# Altium PCB 1H-WSL007-2-1.PcbDoc (part 3 of 4)
Units mil, origin at the board's own origin, x right, y up, seen from the top; angles counter-clockwise.
Board outline 6030 x 4220 mil, 4 copper layers (Top Layer, Mid-Layer 1, Mid-Layer 2, Bottom Layer), stack 90.192 mil thick; 369 components, 15 nets, 801 pads, 1963 vias.
Unrouted connection lines stored in the file: 45.
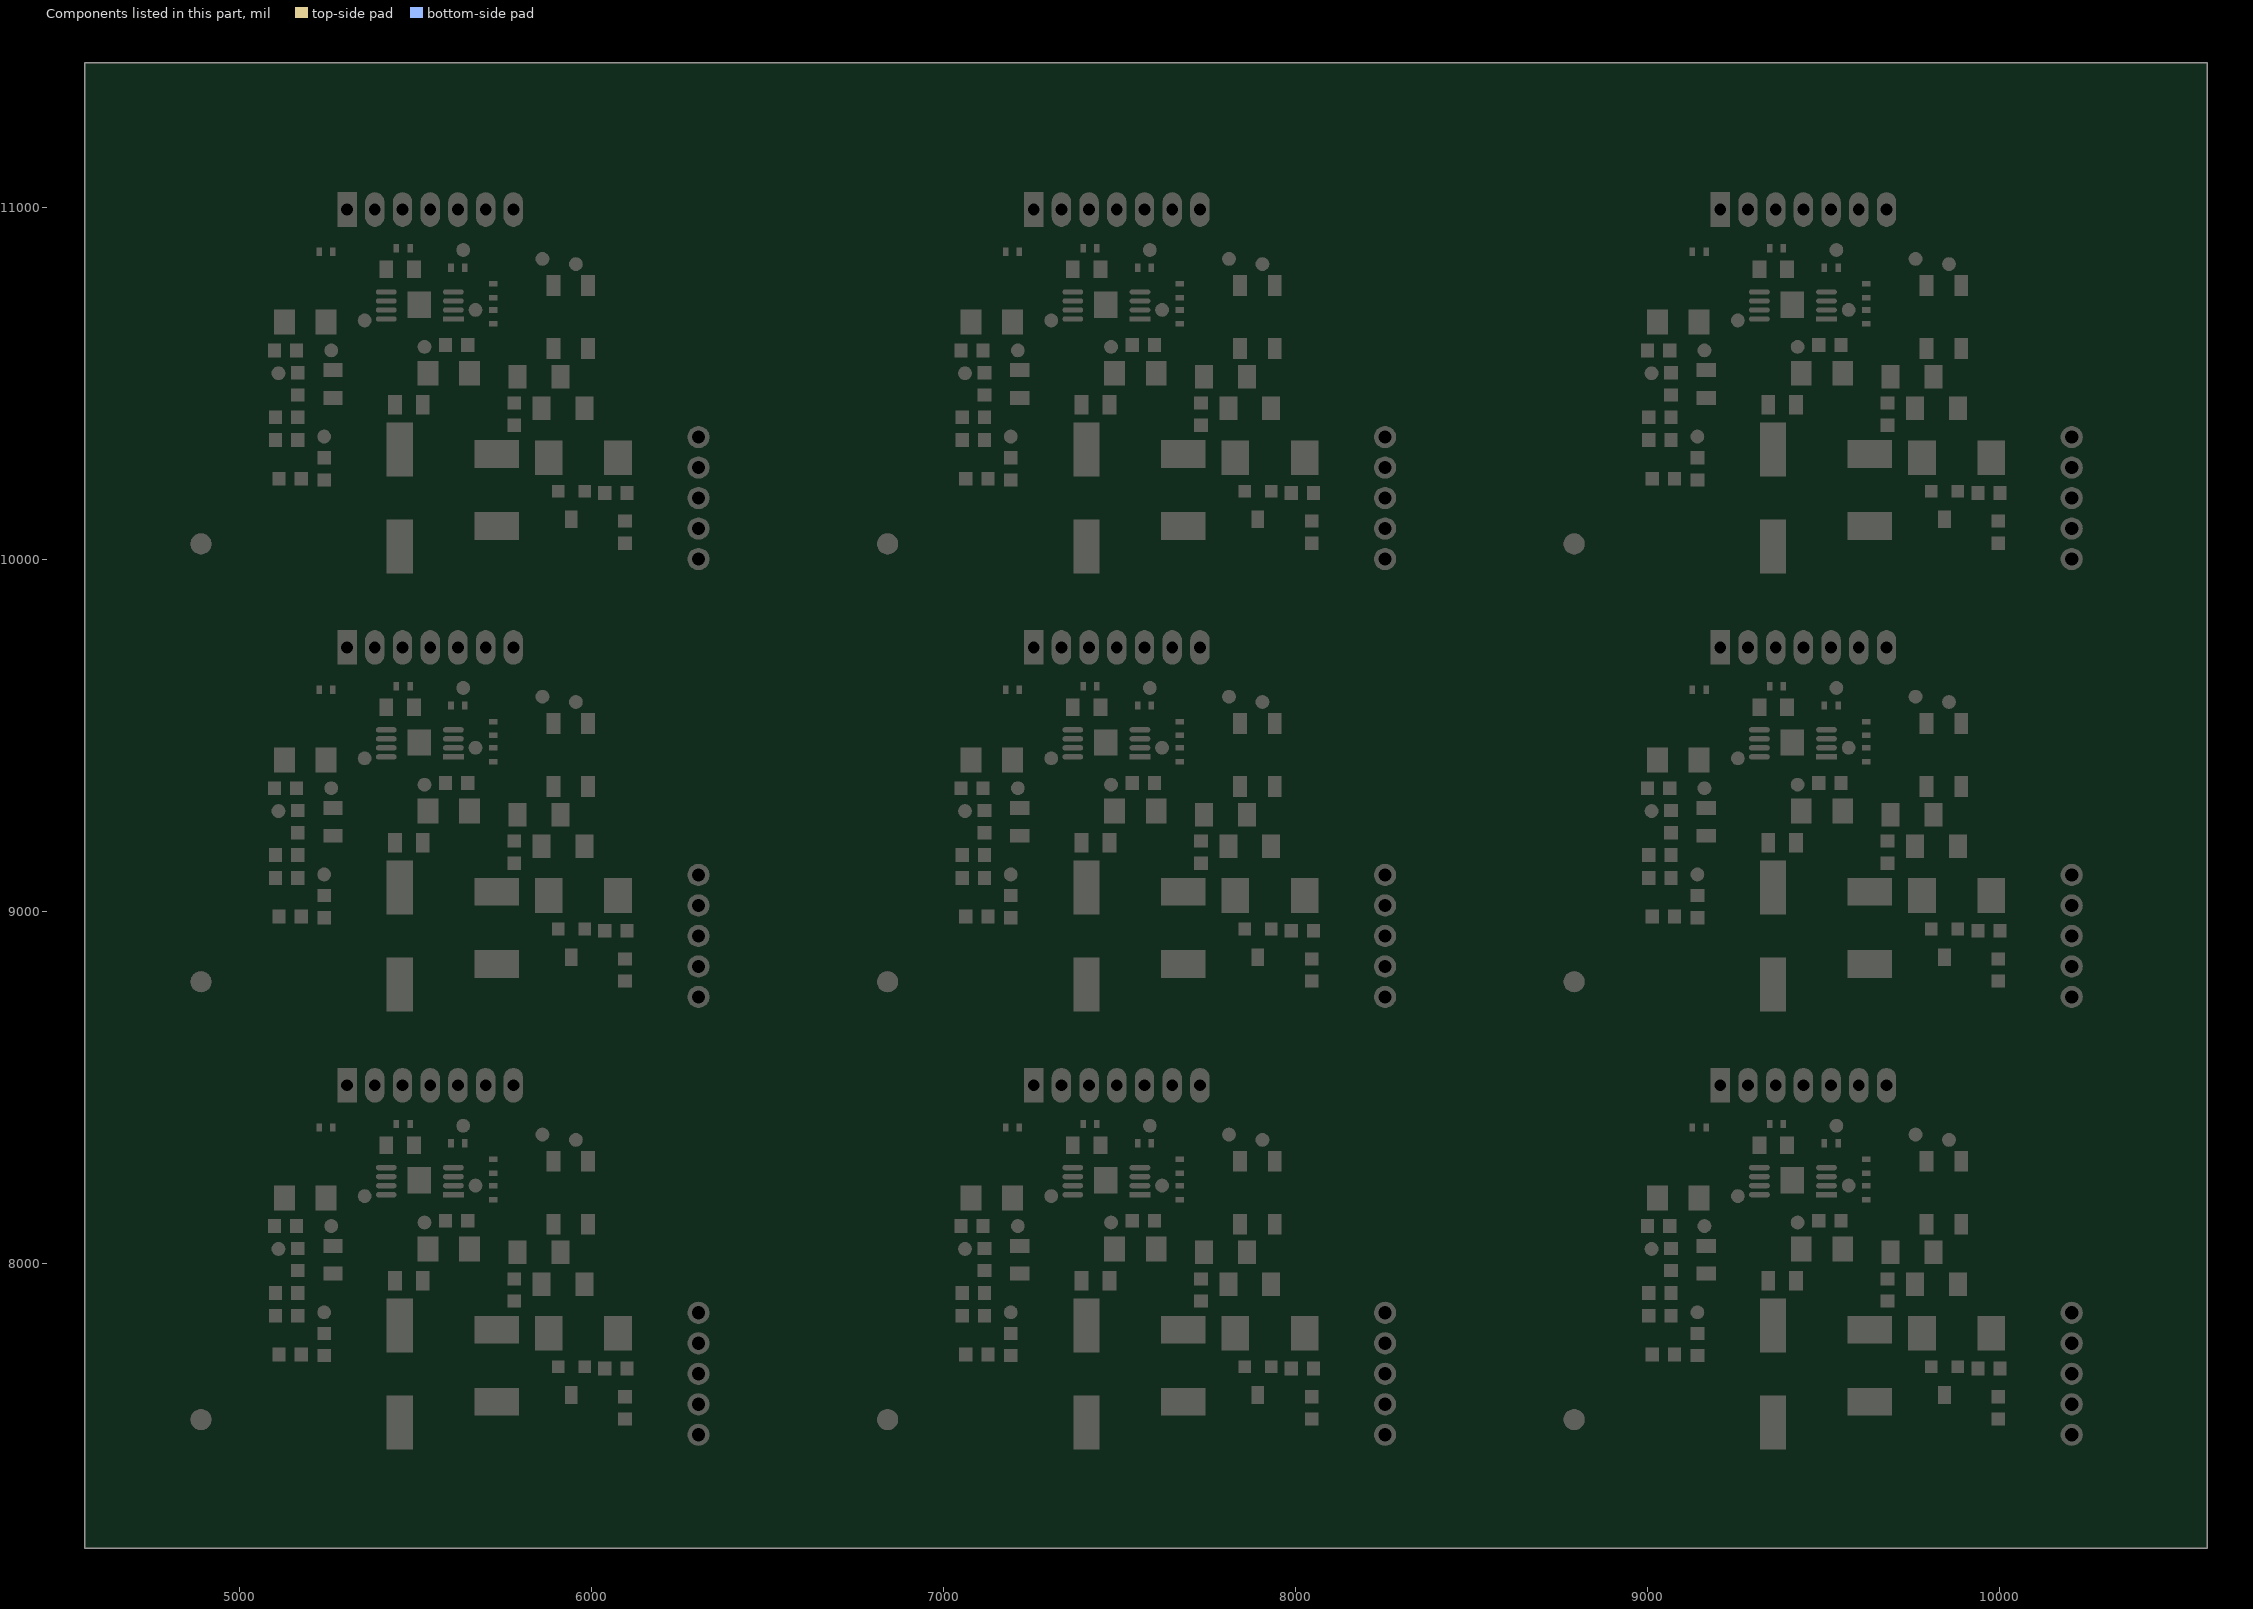
[diagram p5: the components of this part, seen from the top]

## Via types
v1: diameter 24, hole 12, Top Layer to Bottom Layer, tented both sides, 1918 vias
v2: diameter 16, hole 8, Top Layer to Bottom Layer, tented both sides, 45 vias

## Nets (pads, with @x,y where several pads share a name; then routed paths per layer and width w, separated by ;. In a path a pad name is that pad's centre, name@x,y a point inside that pad or via, vN(x,y) a via of type N, cw(c..) or ccw(c..) an arc to the next point about the centre after c; other vN are vias at no path point) (continued)
copper on no net: (continued)
  other v1: 5020,7440 5235,7440 5624.41,7439.74 5845,7440 6500,7440 6970.79,7440 7185.79,7440 7575.2,7439.74 7795.79,7440 8450.79,7440 8921.57,7440 9136.57,7440 9525.98,7439.74 9746.57,7440 10401.57,7440 5450,7445 6050,7445 6220,7445 6365,7445 6565,7445 7400.79,7445 8000.79,7445 8170.79,7445 8315.79,7445 8515.79,7445 9351.57,7445 9951.57,7445 10121.57,7445 10266.57,7445 10466.57,7445 4775,7470 6725.79,7470 8676.57,7470 6430,7490 8380.79,7490 10331.57,7490 5725,7495 7675.79,7495 9626.57,7495 5135,7505 5845,7505 7085.79,7505 7795.79,7505 9036.57,7505 9746.57,7505 6100,7510 8050.79,7510 10001.57,7510 5040,7520 6210,7520 6990.79,7520 8160.79,7520 8941.57,7520 10111.57,7520 5530,7530 5665,7530 7480.79,7530 7615.79,7530 9431.57,7530 9566.57,7530 5785,7535 7735.79,7535 9686.57,7535 5390,7540 6030,7540 7340.79,7540 7980.79,7540 9291.57,7540 9931.57,7540 5240,7555 6440,7555 7190.79,7555 8390.79,7555 9141.57,7555 10341.57,7555 5190,7560 6185,7560 7140.79,7560 8135.79,7560 9091.57,7560 10086.57,7560 6500,7570 8450.79,7570 10401.57,7570 6380,7575 8330.79,7575 10281.57,7575 5135,7585 5850,7585 7085.79,7585 7800.79,7585 9036.57,7585 9751.57,7585 5560,7590 6570,7590 7510.79,7590 8520.79,7590 9461.57,7590 10471.57,7590 5640,7595 6225,7595 7590.79,7595 8175.79,7595 9541.57,7595 10126.57,7595 5295,7600 7245.79,7600 9196.57,7600 6150,7605 8100.79,7605 10051.57,7605 5365,7625 7315.79,7625 9266.57,7625 5180,7630 6020,7630 7130.79,7630 7970.79,7630 9081.57,7630 9921.57,7630 5455,7650 7405.79,7650 9356.57,7650 5900,7655 7850.79,7655 9801.57,7655 6375,7665 8325.79,7665 10276.57,7665 4750,7670 5675,7670 5795,7670 6700.79,7670 7625.79,7670 7745.79,7670 8651.57,7670 9576.57,7670 9696.57,7670 5575,7680 7525.79,7680 9476.57,7680 5105,7685 5245,7685 7055.79,7685 7195.79,7685 9006.57,7685 9146.57,7685 6230,7695 8180.79,7695 10131.57,7695 6155,7700 8105.79,7700 10056.57,7700 5740,7710 7690.79,7710 9641.57,7710 5450,7715 7400.79,7715 9351.57,7715 5860,7720 7810.79,7720 9761.57,7720 6255,7730 8205.79,7730 10156.57,7730 6565,7735 8515.79,7735 10466.57,7735 5790,7745 7740.79,7745 9691.57,7745 6380,7750 8330.79,7750 10281.57,7750 6000,7755 7950.79,7755 9901.57,7755 5300,7760 5380,7760 5525,7760 5630,7760 7250.79,7760 7330.79,7760 7475.79,7760 7580.79,7760 9201.57,7760 9281.57,7760 9426.57,7760 9531.57,7760 5095,7795 7045.79,7795 8996.57,7795 5195,7805 6480,7805 7145.79,7805 8430.79,7805 9096.57,7805 10381.57,7805 6260,7820 8210.79,7820 10161.57,7820 6145,7825 8095.79,7825 10046.57,7825 6195,7850 8145.79,7850 10096.57,7850 5525,7855 7475.79,7855 9426.57,7855 5635,7860 6385,7860 7585.79,7860 8335.79,7860 9536.57,7860 10286.57,7860 5295,7865 6565,7865 7245.79,7865 8515.79,7865 9196.57,7865 10466.57,7865 4750,7875 6000,7875 6700.79,7875 7950.79,7875 8651.57,7875 9901.57,7875 5830,7880 5905,7880 6440,7880 7780.79,7880 7855.79,7880 8390.79,7880 9731.57,7880 9806.57,7880 10341.57,7880 5730,7885 6100,7885 7680.79,7885 8050.79,7885 9631.57,7885 10001.57,7885 5520,7895 7470.79,7895 9421.57,7895 5585,7910 6210,7910 7535.79,7910 8160.79,7910 9486.57,7910 10111.57,7910 5285,7915 5665,7915 6155,7915 7235.79,7915 7615.79,7915 8105.79,7915 9186.57,7915 9566.57,7915 10056.57,7915 5210,7930 5390,7930 7160.79,7930 7340.79,7930 9111.57,7930 9291.57,7930 6040,7935 7990.79,7935 9941.57,7935 6100,7945 8050.79,7945 10001.57,7945 5910,7960 7860.79,7960 9811.57,7960 5570,7975 5665,7975 7520.79,7975 7615.79,7975 9471.57,7975 9566.57,7975 6560,7985 8510.79,7985 10461.57,7985 5115,7990 6235,7990 6375,7990 6495,7990 7065.79,7990 8185.79,7990 8325.79,7990 8445.79,7990 9016.57,7990 10136.57,7990 10276.57,7990 10396.57,7990 5475,8005 6115,8005 7425.79,8005 8065.79,8005 9376.57,8005 10016.57,8005 5325,8015 7275.79,8015 9226.57,8015 5855,8025 7805.79,8025 9756.57,8025 4890,8030 5210,8030 6840.79,8030 7160.79,8030 8791.57,8030 9111.57,8030 4970,8045 6920.79,8045 8871.57,8045 5730,8050 5995,8050 6045,8050 7680.79,8050 7945.79,8050 7995.79,8050 9631.57,8050 9896.57,8050 9946.57,8050 5395,8055 7345.79,8055 9296.57,8055 5055,8060 7005.79,8060 8956.57,8060 5595,8070 7545.79,8070 9496.57,8070 4805,8075 6755.79,8075 8706.57,8075 5450,8080 7400.79,8080 9351.57,8080 5315,8090 7265.79,8090 9216.57,8090 4745,8095 4995,8095 5360,8095 6695.79,8095 6945.79,8095 7310.79,8095 8646.57,8095 8896.57,8095 9261.57,8095 6035,8115 7985.79,8115 9936.57,8115 4930,8120 5210,8120 5700,8120 6105,8120 6880.79,8120 7160.79,8120 7650.79,8120 8055.79,8120 8831.57,8120 9111.57,8120 9601.57,8120 10006.57,8120 4855,8140 6805.79,8140 8756.57,8140 5375,8145 5835,8145 7325.79,8145 7785.79,8145 9276.57,8145 9736.57,8145 5505,8155 7455.79,8155 9406.57,8155 5310,8160 5445,8160 7260.79,8160 7395.79,8160 9211.57,8160 9346.57,8160 5070,8165 5560,8165 7020.79,8165 7510.79,8165 8971.57,8165 9461.57,8165 5670,8170 7620.79,8170 9571.57,8170 5000,8180 6950.79,8180 8901.57,8180 5760,8185 7710.79,8185 9661.57,8185 4930,8205 6035,8205 6880.79,8205 7985.79,8205 8831.57,8205 9936.57,8205 4840,8210 6790.79,8210 8741.57,8210 5070,8220 7020.79,8220 8971.57,8220 5800,8225 7750.79,8225 9701.57,8225 6105,8240 8055.79,8240 10006.57,8240 5205,8245 7155.79,8245 9106.57,8245 5130,8250 5295,8250 7080.79,8250 7245.79,8250 9031.57,8250 9196.57,8250 4885,8260 6835.79,8260 8786.57,8260 4960,8265 5680,8265 6910.79,8265 7630.79,8265 8861.57,8265 9581.57,8265 5840,8270 7790.79,8270 9741.57,8270 5760,8280 7710.79,8280 9661.57,8280 5220,8285 7170.79,8285 9121.57,8285 5030,8289.13 6980.79,8289.13 8931.57,8289.13 4810,8290 6760.79,8290 8711.57,8290 5460,8295 5555,8295 7410.79,8295 7505.79,8295 9361.57,8295 9456.57,8295 4745,8300 5615,8300 6045,8300 6695.79,8300 7565.79,8300 7995.79,8300 8646.57,8300 9516.57,8300 9946.57,8300 5795,8310 7745.79,8310 9696.57,8310 5365,8325 7315.79,8325 9266.57,8325 5155,8335 5735,8335 7105.79,8335 7685.79,8335 9056.57,8335 9636.57,8335 5102.01,8340 5555,8340 7052.8,8340 7505.79,8340 9003.58,8340 9456.57,8340 5810,8350 6005,8350 7760.79,8350 7955.79,8350 9711.57,8350 9906.57,8350 5295,8360 7245.79,8360 9196.57,8360 5680,8370 7630.79,8370 9581.57,8370 6110,8375 8060.79,8375 10011.57,8375 5385,8385 5745,8385 7335.79,8385 7695.79,8385 9286.57,8385 9646.57,8385 5180,8390 5550,8390 6040,8390 7130.79,8390 7500.79,8390 7990.79,8390 9081.57,8390 9451.57,8390 9941.57,8390 5000,8400 5930,8400 6950.79,8400 7880.79,8400 8901.57,8400 9831.57,8400 5595,8425 5675,8425 7545.79,8425 7625.79,8425 9496.57,8425 9576.57,8425 5225,8430 5300,8430 5410,8430 7175.79,8430 7250.79,8430 7360.79,8430 9126.57,8430 9201.57,8430 9311.57,8430 5140,8440 5500,8440 7090.79,8440 7450.79,8440 9041.57,8440 9401.57,8440 5835,8445 5985,8445 7785.79,8445 7935.79,8445 9736.57,8445 9886.57,8445 5085,8455 7035.79,8455 8986.57,8455 4945,8460 6895.79,8460 8846.57,8460 6040,8465 7990.79,8465 9941.57,8465 4835,8495 5020,8495 6785.79,8495 6970.79,8495 8736.57,8495 8921.57,8495 5190,8500 6110,8500 7140.79,8500 8060.79,8500 9091.57,8500 10011.57,8500 4745,8510 6695.79,8510 8646.57,8510 5875,8525 7825.79,8525 9776.57,8525 5105,8530 6045,8530 7055.79,8530 7995.79,8530 9006.57,8530 9946.57,8530 4910,8540 6860.79,8540 8811.57,8540 5245,8550 7195.79,8550 9146.57,8550 5010,8555 6090,8555 6960.79,8555 8040.79,8555 8911.57,8555 9991.57,8555 5165,8560 7115.79,8560 9066.57,8560 5055,8565 7005.79,8565 8956.57,8565 5855,8570 7805.79,8570 9756.57,8570 5440,8590 5725,8590 7390.79,8590 7675.79,8590 9341.57,8590 9626.57,8590 5355,8605 5560,8605 7305.79,8605 7510.79,8605 9256.57,8605 9461.57,8605 4780,8606.26 6730.79,8606.26 8681.57,8606.26 6065,8616.26 8015.79,8616.26 9966.57,8616.26 4990,8631.26 5225,8631.26 5490,8631.26 5680,8631.26 5835,8631.26 5940,8631.26 6940.79,8631.26 7175.79,8631.26 7440.79,8631.26 7630.79,8631.26 7785.79,8631.26 7890.79,8631.26 8891.57,8631.26 9126.57,8631.26 9391.57,8631.26 9581.57,8631.26 9736.57,8631.26 9841.57,8631.26 5020,8684.09 5235,8684.09 5624.41,8683.83 5845,8684.09 6500,8684.09 6970.79,8684.09 7185.79,8684.09 7575.2,8683.83 7795.79,8684.09 8450.79,8684.09 8921.57,8684.09 9136.57,8684.09 9525.98,8683.83 9746.57,8684.09 10401.57,8684.09 5450,8689.09 6050,8689.09 6220,8689.09 6365,8689.09 6565,8689.09 7400.79,8689.09 8000.79,8689.09 8170.79,8689.09 8315.79,8689.09 8515.79,8689.09 9351.57,8689.09 9951.57,8689.09 10121.57,8689.09 10266.57,8689.09 10466.57,8689.09 4775,8714.09 6725.79,8714.09 8676.57,8714.09 6430,8734.09 8380.79,8734.09 10331.57,8734.09 5725,8739.09 7675.79,8739.09 9626.57,8739.09 5135,8749.09 5845,8749.09 7085.79,8749.09 7795.79,8749.09 9036.57,8749.09 9746.57,8749.09 6100,8754.09 8050.79,8754.09 10001.57,8754.09 5040,8764.09 6210,8764.09 6990.79,8764.09 8160.79,8764.09 8941.57,8764.09 10111.57,8764.09 5530,8774.09 5665,8774.09 7480.79,8774.09 7615.79,8774.09 9431.57,8774.09 9566.57,8774.09 5785,8779.09 7735.79,8779.09 9686.57,8779.09 5390,8784.09 6030,8784.09 7340.79,8784.09 7980.79,8784.09 9291.57,8784.09 9931.57,8784.09 5240,8799.09 6440,8799.09 7190.79,8799.09 8390.79,8799.09 9141.57,8799.09 10341.57,8799.09 5190,8804.09 6185,8804.09 7140.79,8804.09 8135.79,8804.09 9091.57,8804.09 10086.57,8804.09 6500,8814.09 8450.79,8814.09 10401.57,8814.09 6380,8819.09 8330.79,8819.09 10281.57,8819.09 5135,8829.09 5850,8829.09 7085.79,8829.09 7800.79,8829.09 9036.57,8829.09 9751.57,8829.09 5560,8834.09 6570,8834.09 7510.79,8834.09 8520.79,8834.09 9461.57,8834.09 10471.57,8834.09 5640,8839.09 6225,8839.09 7590.79,8839.09 8175.79,8839.09 9541.57,8839.09 10126.57,8839.09 5295,8844.09 7245.79,8844.09 9196.57,8844.09 6150,8849.09 8100.79,8849.09 10051.57,8849.09 5365,8869.09 7315.79,8869.09 9266.57,8869.09 5180,8874.09 6020,8874.09 7130.79,8874.09 7970.79,8874.09 9081.57,8874.09 9921.57,8874.09 5455,8894.09 7405.79,8894.09 9356.57,8894.09 5900,8899.09 7850.79,8899.09 9801.57,8899.09 6375,8909.09 8325.79,8909.09 10276.57,8909.09 4750,8914.09 5675,8914.09 5795,8914.09 6700.79,8914.09 7625.79,8914.09 7745.79,8914.09 8651.57,8914.09 9576.57,8914.09 9696.57,8914.09 5575,8924.09 7525.79,8924.09 9476.57,8924.09 5105,8929.09 5245,8929.09 7055.79,8929.09 7195.79,8929.09 9006.57,8929.09 9146.57,8929.09 6230,8939.09 8180.79,8939.09 10131.57,8939.09 6155,8944.09 8105.79,8944.09 10056.57,8944.09 5740,8954.09 7690.79,8954.09 9641.57,8954.09 5450,8959.09 7400.79,8959.09 9351.57,8959.09 5860,8964.09 7810.79,8964.09 9761.57,8964.09 6255,8974.09 8205.79,8974.09 10156.57,8974.09 6565,8979.09 8515.79,8979.09 10466.57,8979.09 5790,8989.09 7740.79,8989.09 9691.57,8989.09 6380,8994.09 8330.79,8994.09 10281.57,8994.09 6000,8999.09 7950.79,8999.09 9901.57,8999.09 5300,9004.09 5380,9004.09 5525,9004.09 5630,9004.09 7250.79,9004.09 7330.79,9004.09 7475.79,9004.09 7580.79,9004.09 9201.57,9004.09 9281.57,9004.09 9426.57,9004.09 9531.57,9004.09 5095,9039.09 7045.79,9039.09 8996.57,9039.09 5195,9049.09 6480,9049.09 7145.79,9049.09 8430.79,9049.09 9096.57,9049.09 10381.57,9049.09 6260,9064.09 8210.79,9064.09 10161.57,9064.09 6145,9069.09 8095.79,9069.09 10046.57,9069.09 6195,9094.09 8145.79,9094.09 10096.57,9094.09 5525,9099.09 7475.79,9099.09 9426.57,9099.09 5635,9104.09 6385,9104.09 7585.79,9104.09 8335.79,9104.09 9536.57,9104.09 10286.57,9104.09 5295,9109.09 6565,9109.09 7245.79,9109.09 8515.79,9109.09 9196.57,9109.09 10466.57,9109.09 4750,9119.09 6000,9119.09 6700.79,9119.09 7950.79,9119.09 8651.57,9119.09 9901.57,9119.09 5830,9124.09 5905,9124.09 6440,9124.09 7780.79,9124.09 7855.79,9124.09 8390.79,9124.09 9731.57,9124.09 9806.57,9124.09 10341.57,9124.09 5730,9129.09 6100,9129.09 7680.79,9129.09 8050.79,9129.09 9631.57,9129.09 10001.57,9129.09 5520,9139.09 7470.79,9139.09 9421.57,9139.09 5585,9154.09 6210,9154.09 7535.79,9154.09 8160.79,9154.09 9486.57,9154.09 10111.57,9154.09 5285,9159.09 5665,9159.09 6155,9159.09 7235.79,9159.09 7615.79,9159.09 8105.79,9159.09 9186.57,9159.09 9566.57,9159.09 10056.57,9159.09 5210,9174.09 5390,9174.09 7160.79,9174.09 7340.79,9174.09 9111.57,9174.09 9291.57,9174.09 6040,9179.09 7990.79,9179.09 9941.57,9179.09 6100,9189.09 8050.79,9189.09 10001.57,9189.09 5910,9204.09 7860.79,9204.09 9811.57,9204.09 5570,9219.09 5665,9219.09 7520.79,9219.09 7615.79,9219.09 9471.57,9219.09 9566.57,9219.09 6560,9229.09 8510.79,9229.09 10461.57,9229.09 5115,9234.09 6235,9234.09 6375,9234.09 6495,9234.09 7065.79,9234.09 8185.79,9234.09 8325.79,9234.09 8445.79,9234.09 9016.57,9234.09 10136.57,9234.09 10276.57,9234.09 10396.57,9234.09 5475,9249.09 6115,9249.09 7425.79,9249.09 8065.79,9249.09 9376.57,9249.09 10016.57,9249.09 5325,9259.09 7275.79,9259.09 9226.57,9259.09 5855,9269.09 7805.79,9269.09 9756.57,9269.09 4890,9274.09 5210,9274.09 6840.79,9274.09 7160.79,9274.09 8791.57,9274.09 9111.57,9274.09 4970,9289.09 6920.79,9289.09 8871.57,9289.09 5730,9294.09 5995,9294.09 6045,9294.09 7680.79,9294.09 7945.79,9294.09 7995.79,9294.09 9631.57,9294.09 9896.57,9294.09 9946.57,9294.09 5395,9299.09 7345.79,9299.09 9296.57,9299.09 5055,9304.09 7005.79,9304.09 8956.57,9304.09 5595,9314.09 7545.79,9314.09 9496.57,9314.09 4805,9319.09 6755.79,9319.09 8706.57,9319.09 5450,9324.09 7400.79,9324.09 9351.57,9324.09 5315,9334.09 7265.79,9334.09 9216.57,9334.09 4745,9339.09 4995,9339.09 5360,9339.09 6695.79,9339.09 6945.79,9339.09 7310.79,9339.09 8646.57,9339.09 8896.57,9339.09 9261.57,9339.09 6035,9359.09 7985.79,9359.09 9936.57,9359.09 4930,9364.09 5210,9364.09 5700,9364.09 6105,9364.09 6880.79,9364.09 7160.79,9364.09 7650.79,9364.09 8055.79,9364.09 8831.57,9364.09 9111.57,9364.09 9601.57,9364.09 10006.57,9364.09 4855,9384.09 6805.79,9384.09 8756.57,9384.09 5375,9389.09 5835,9389.09 7325.79,9389.09 7785.79,9389.09 9276.57,9389.09 9736.57,9389.09 5505,9399.09 7455.79,9399.09 9406.57,9399.09 5310,9404.09 5445,9404.09 7260.79,9404.09 7395.79,9404.09 9211.57,9404.09 9346.57,9404.09 5070,9409.09 5560,9409.09 7020.79,9409.09 7510.79,9409.09 8971.57,9409.09 9461.57,9409.09 5670,9414.09 7620.79,9414.09 9571.57,9414.09 5000,9424.09 6950.79,9424.09 8901.57,9424.09 5760,9429.09 7710.79,9429.09 9661.57,9429.09 4930,9449.09 6035,9449.09 6880.79,9449.09 7985.79,9449.09 8831.57,9449.09 9936.57,9449.09 4840,9454.09 6790.79,9454.09 8741.57,9454.09 5070,9464.09 7020.79,9464.09 8971.57,9464.09 5800,9469.09 7750.79,9469.09 9701.57,9469.09 6105,9484.09 8055.79,9484.09 10006.57,9484.09 5205,9489.09 7155.79,9489.09 9106.57,9489.09 5130,9494.09 5295,9494.09 7080.79,9494.09 7245.79,9494.09 9031.57,9494.09 9196.57,9494.09 4885,9504.09 6835.79,9504.09 8786.57,9504.09 4960,9509.09 5680,9509.09 6910.79,9509.09 7630.79,9509.09 8861.57,9509.09 9581.57,9509.09 5840,9514.09 7790.79,9514.09 9741.57,9514.09 5760,9524.09 7710.79,9524.09 9661.57,9524.09 5220,9529.09 7170.79,9529.09 9121.57,9529.09 5030,9533.23 6980.79,9533.23 8931.57,9533.23 4810,9534.09 6760.79,9534.09 8711.57,9534.09 5460,9539.09 5555,9539.09 7410.79,9539.09 7505.79,9539.09 9361.57,9539.09 9456.57,9539.09 4745,9544.09 5615,9544.09 6045,9544.09 6695.79,9544.09 7565.79,9544.09 7995.79,9544.09 8646.57,9544.09 9516.57,9544.09 9946.57,9544.09 5795,9554.09 7745.79,9554.09 9696.57,9554.09 5365,9569.09 7315.79,9569.09 9266.57,9569.09 5155,9579.09 5735,9579.09 7105.79,9579.09 7685.79,9579.09 9056.57,9579.09 9636.57,9579.09 5102.01,9584.09 5555,9584.09 7052.8,9584.09 7505.79,9584.09 9003.58,9584.09 9456.57,9584.09 5810,9594.09 6005,9594.09 7760.79,9594.09 7955.79,9594.09 9711.57,9594.09 9906.57,9594.09 5295,9604.09 7245.79,9604.09 9196.57,9604.09 5680,9614.09 7630.79,9614.09 9581.57,9614.09 6110,9619.09 8060.79,9619.09 10011.57,9619.09 5385,9629.09 5745,9629.09 7335.79,9629.09 7695.79,9629.09 9286.57,9629.09 9646.57,9629.09 5180,9634.09 5550,9634.09 6040,9634.09 7130.79,9634.09 7500.79,9634.09 7990.79,9634.09 9081.57,9634.09 9451.57,9634.09 9941.57,9634.09 5000,9644.09 5930,9644.09 6950.79,9644.09 7880.79,9644.09 8901.57,9644.09 9831.57,9644.09 5595,9669.09 5675,9669.09 7545.79,9669.09 7625.79,9669.09 9496.57,9669.09 9576.57,9669.09 5225,9674.09 5300,9674.09 5410,9674.09 7175.79,9674.09 7250.79,9674.09 7360.79,9674.09 9126.57,9674.09 9201.57,9674.09 9311.57,9674.09 5140,9684.09 5500,9684.09 7090.79,9684.09 7450.79,9684.09 9041.57,9684.09 9401.57,9684.09 5835,9689.09 5985,9689.09 7785.79,9689.09 7935.79,9689.09 9736.57,9689.09 9886.57,9689.09 5085,9699.09 7035.79,9699.09 8986.57,9699.09 4945,9704.09 6895.79,9704.09 8846.57,9704.09 6040,9709.09 7990.79,9709.09 9941.57,9709.09 4835,9739.09 5020,9739.09 6785.79,9739.09 6970.79,9739.09 8736.57,9739.09 8921.57,9739.09 5190,9744.09 6110,9744.09 7140.79,9744.09 8060.79,9744.09 9091.57,9744.09 10011.57,9744.09 4745,9754.09 6695.79,9754.09 8646.57,9754.09 5875,9769.09 7825.79,9769.09 9776.57,9769.09 5105,9774.09 6045,9774.09 7055.79,9774.09 7995.79,9774.09 9006.57,9774.09 9946.57,9774.09 4910,9784.09 6860.79,9784.09 8811.57,9784.09 5245,9794.09 7195.79,9794.09 9146.57,9794.09 5010,9799.09 6090,9799.09 6960.79,9799.09 8040.79,9799.09 8911.57,9799.09 9991.57,9799.09 5165,9804.09 7115.79,9804.09 9066.57,9804.09 5055,9809.09 7005.79,9809.09 8956.57,9809.09 5855,9814.09 7805.79,9814.09 9756.57,9814.09 5440,9834.09 5725,9834.09 7390.79,9834.09 7675.79,9834.09 9341.57,9834.09 9626.57,9834.09 5355,9849.09 5560,9849.09 7305.79,9849.09 7510.79,9849.09 9256.57,9849.09 9461.57,9849.09 4780,9850.35 6730.79,9850.35 8681.57,9850.35 6065,9860.35 8015.79,9860.35 9966.57,9860.35 4990,9875.35 5225,9875.35 5490,9875.35 5680,9875.35 5835,9875.35 5940,9875.35 6940.79,9875.35 7175.79,9875.35 7440.79,9875.35 7630.79,9875.35 7785.79,9875.35 7890.79,9875.35 8891.57,9875.35 9126.57,9875.35 9391.57,9875.35 9581.57,9875.35 9736.57,9875.35 9841.57,9875.35 5020,9928.19 5235,9928.19 5624.41,9927.92 5845,9928.19 6500,9928.19 6970.79,9928.19 7185.79,9928.19 7575.2,9927.92 7795.79,9928.19 8450.79,9928.19 8921.57,9928.19 9136.57,9928.19 9525.98,9927.92 9746.57,9928.19 10401.57,9928.19 5450,9933.19 6050,9933.19 6220,9933.19 6365,9933.19 6565,9933.19 7400.79,9933.19 8000.79,9933.19 8170.79,9933.19 8315.79,9933.19 8515.79,9933.19 9351.57,9933.19 9951.57,9933.19 10121.57,9933.19 10266.57,9933.19 10466.57,9933.19 4775,9958.19 6725.79,9958.19 8676.57,9958.19 6430,9978.19 8380.79,9978.19 10331.57,9978.19 5725,9983.19 7675.79,9983.19 9626.57,9983.19 5135,9993.19 5845,9993.19 7085.79,9993.19 7795.79,9993.19 9036.57,9993.19 9746.57,9993.19 6100,9998.19 8050.79,9998.19 10001.57,9998.19 5040,10008.19 6210,10008.19 6990.79,10008.19 8160.79,10008.19 8941.57,10008.19 10111.57,10008.19 5530,10018.19 5665,10018.19 7480.79,10018.19 7615.79,10018.19 9431.57,10018.19 9566.57,10018.19 5785,10023.19 7735.79,10023.19 9686.57,10023.19 5390,10028.19 6030,10028.19 7340.79,10028.19 7980.79,10028.19 9291.57,10028.19 9931.57,10028.19 5240,10043.19 6440,10043.19 7190.79,10043.19 8390.79,10043.19 9141.57,10043.19 10341.57,10043.19 5190,10048.19 6185,10048.19 7140.79,10048.19 8135.79,10048.19 9091.57,10048.19 10086.57,10048.19 6500,10058.19 8450.79,10058.19 10401.57,10058.19 6380,10063.19 8330.79,10063.19 10281.57,10063.19 5135,10073.19 5850,10073.19 7085.79,10073.19 7800.79,10073.19 9036.57,10073.19 9751.57,10073.19 5560,10078.19 6570,10078.19 7510.79,10078.19 8520.79,10078.19 9461.57,10078.19 10471.57,10078.19 5640,10083.19 6225,10083.19 7590.79,10083.19 8175.79,10083.19 9541.57,10083.19 10126.57,10083.19 5295,10088.19 7245.79,10088.19 9196.57,10088.19 6150,10093.19 8100.79,10093.19 10051.57,10093.19 5365,10113.19 7315.79,10113.19 9266.57,10113.19 5180,10118.19 6020,10118.19 7130.79,10118.19 7970.79,10118.19 9081.57,10118.19 9921.57,10118.19 5455,10138.19 7405.79,10138.19 9356.57,10138.19 5900,10143.19 7850.79,10143.19 9801.57,10143.19 6375,10153.19 8325.79,10153.19 10276.57,10153.19 4750,10158.19 5675,10158.19 5795,10158.19 6700.79,10158.19 7625.79,10158.19 7745.79,10158.19 8651.57,10158.19 9576.57,10158.19 9696.57,10158.19 5575,10168.19 7525.79,10168.19 9476.57,10168.19 5105,10173.19 5245,10173.19 7055.79,10173.19 7195.79,10173.19 9006.57,10173.19 9146.57,10173.19 6230,10183.19 8180.79,10183.19 10131.57,10183.19 6155,10188.19 8105.79,10188.19 10056.57,10188.19 5740,10198.19 7690.79,10198.19 9641.57,10198.19 5450,10203.19 7400.79,10203.19 9351.57,10203.19 5860,10208.19 7810.79,10208.19 9761.57,10208.19 6255,10218.19 8205.79,10218.19 10156.57,10218.19 6565,10223.19 8515.79,10223.19 10466.57,10223.19 5790,10233.19 7740.79,10233.19 9691.57,10233.19 6380,10238.19 8330.79,10238.19 10281.57,10238.19 6000,10243.19 7950.79,10243.19 9901.57,10243.19 5300,10248.19 5380,10248.19 5525,10248.19 5630,10248.19 7250.79,10248.19 7330.79,10248.19 7475.79,10248.19 7580.79,10248.19 9201.57,10248.19 9281.57,10248.19 9426.57,10248.19 9531.57,10248.19 5095,10283.19 7045.79,10283.19 8996.57,10283.19 5195,10293.19 6480,10293.19 7145.79,10293.19 8430.79,10293.19 9096.57,10293.19 10381.57,10293.19 6260,10308.19 8210.79,10308.19 10161.57,10308.19 6145,10313.19 8095.79,10313.19 10046.57,10313.19 6195,10338.19 8145.79,10338.19 10096.57,10338.19 5525,10343.19 7475.79,10343.19 9426.57,10343.19 5635,10348.19 6385,10348.19 7585.79,10348.19 8335.79,10348.19 9536.57,10348.19 10286.57,10348.19 5295,10353.19 6565,10353.19 7245.79,10353.19 8515.79,10353.19 9196.57,10353.19 10466.57,10353.19 4750,10363.19 6000,10363.19 6700.79,10363.19 7950.79,10363.19 8651.57,10363.19 9901.57,10363.19 5830,10368.19 5905,10368.19 6440,10368.19 7780.79,10368.19 7855.79,10368.19 8390.79,10368.19 9731.57,10368.19 9806.57,10368.19 10341.57,10368.19 5730,10373.19 6100,10373.19 7680.79,10373.19 8050.79,10373.19 9631.57,10373.19 10001.57,10373.19 5520,10383.19 7470.79,10383.19 9421.57,10383.19 5585,10398.19 6210,10398.19 7535.79,10398.19 8160.79,10398.19 9486.57,10398.19 10111.57,10398.19 5285,10403.19 5665,10403.19 6155,10403.19 7235.79,10403.19 7615.79,10403.19 8105.79,10403.19 9186.57,10403.19 9566.57,10403.19 10056.57,10403.19 5210,10418.19 5390,10418.19 7160.79,10418.19 7340.79,10418.19 9111.57,10418.19 9291.57,10418.19 6040,10423.19 7990.79,10423.19 9941.57,10423.19 6100,10433.19 8050.79,10433.19 10001.57,10433.19 5910,10448.19 7860.79,10448.19 9811.57,10448.19 5570,10463.19 5665,10463.19 7520.79,10463.19 7615.79,10463.19 9471.57,10463.19 9566.57,10463.19 6560,10473.19 8510.79,10473.19 10461.57,10473.19 5115,10478.19 6235,10478.19 6375,10478.19 6495,10478.19 7065.79,10478.19 8185.79,10478.19 8325.79,10478.19 8445.79,10478.19 9016.57,10478.19 10136.57,10478.19 10276.57,10478.19 10396.57,10478.19 5475,10493.19 6115,10493.19 7425.79,10493.19 8065.79,10493.19 9376.57,10493.19 10016.57,10493.19 5325,10503.19 7275.79,10503.19 9226.57,10503.19 5855,10513.19 7805.79,10513.19 9756.57,10513.19 4890,10518.19 5210,10518.19 6840.79,10518.19 7160.79,10518.19 8791.57,10518.19 9111.57,10518.19 4970,10533.19 6920.79,10533.19 8871.57,10533.19 5730,10538.19 5995,10538.19 6045,10538.19 7680.79,10538.19 7945.79,10538.19 7995.79,10538.19 9631.57,10538.19 9896.57,10538.19 9946.57,10538.19 5395,10543.19 7345.79,10543.19 9296.57,10543.19 5055,10548.19 7005.79,10548.19 8956.57,10548.19 5595,10558.19 7545.79,10558.19 9496.57,10558.19 4805,10563.19 6755.79,10563.19 8706.57,10563.19 5450,10568.19 7400.79,10568.19 9351.57,10568.19 5315,10578.19 7265.79,10578.19 9216.57,10578.19 4745,10583.19 4995,10583.19 5360,10583.19 6695.79,10583.19 6945.79,10583.19 7310.79,10583.19 8646.57,10583.19 8896.57,10583.19 9261.57,10583.19 6035,10603.19 7985.79,10603.19 9936.57,10603.19 4930,10608.19 5210,10608.19 5700,10608.19 6105,10608.19 6880.79,10608.19 7160.79,10608.19 7650.79,10608.19 8055.79,10608.19 8831.57,10608.19 9111.57,10608.19 9601.57,10608.19 10006.57,10608.19 4855,10628.19 6805.79,10628.19 8756.57,10628.19 5375,10633.19 5835,10633.19 7325.79,10633.19 7785.79,10633.19 9276.57,10633.19 9736.57,10633.19 5505,10643.19 7455.79,10643.19 9406.57,10643.19 5310,10648.19 5445,10648.19 7260.79,10648.19 7395.79,10648.19 9211.57,10648.19 9346.57,10648.19 5070,10653.19 5560,10653.19 7020.79,10653.19 7510.79,10653.19 8971.57,10653.19 9461.57,10653.19 5670,10658.19 7620.79,10658.19 9571.57,10658.19 5000,10668.19 6950.79,10668.19 8901.57,10668.19 5760,10673.19 7710.79,10673.19 9661.57,10673.19 4930,10693.19 6035,10693.19 6880.79,10693.19 7985.79,10693.19 8831.57,10693.19 9936.57,10693.19 4840,10698.19 6790.79,10698.19 8741.57,10698.19 5070,10708.19 7020.79,10708.19 8971.57,10708.19 5800,10713.19 7750.79,10713.19 9701.57,10713.19 6105,10728.19 8055.79,10728.19 10006.57,10728.19 5205,10733.19 7155.79,10733.19 9106.57,10733.19 5130,10738.19 5295,10738.19 7080.79,10738.19 7245.79,10738.19 9031.57,10738.19 9196.57,10738.19 4885,10748.19 6835.79,10748.19 8786.57,10748.19 4960,10753.19 5680,10753.19 6910.79,10753.19 7630.79,10753.19 8861.57,10753.19 9581.57,10753.19 5840,10758.19 7790.79,10758.19 9741.57,10758.19 5760,10768.19 7710.79,10768.19 9661.57,10768.19 5220,10773.19 7170.79,10773.19 9121.57,10773.19 5030,10777.32 6980.79,10777.32 8931.57,10777.32 4810,10778.19 6760.79,10778.19 8711.57,10778.19 5460,10783.19 5555,10783.19 7410.79,10783.19 7505.79,10783.19 9361.57,10783.19 9456.57,10783.19 4745,10788.19 5615,10788.19 6045,10788.19 6695.79,10788.19 7565.79,10788.19 7995.79,10788.19 8646.57,10788.19 9516.57,10788.19 9946.57,10788.19 5795,10798.19 7745.79,10798.19 9696.57,10798.19 5365,10813.19 7315.79,10813.19 9266.57,10813.19 5155,10823.19 5735,10823.19 7105.79,10823.19 7685.79,10823.19 9056.57,10823.19 9636.57,10823.19 5102.01,10828.19 5555,10828.19 7052.8,10828.19 7505.79,10828.19 9003.58,10828.19 9456.57,10828.19 5810,10838.19 6005,10838.19 7760.79,10838.19 7955.79,10838.19 9711.57,10838.19 9906.57,10838.19 5295,10848.19 7245.79,10848.19 9196.57,10848.19 5680,10858.19 7630.79,10858.19 9581.57,10858.19 6110,10863.19 8060.79,10863.19 10011.57,10863.19 5385,10873.19 5745,10873.19 7335.79,10873.19 7695.79,10873.19 9286.57,10873.19 9646.57,10873.19 5180,10878.19 5550,10878.19 6040,10878.19 7130.79,10878.19 7500.79,10878.19 7990.79,10878.19 9081.57,10878.19 9451.57,10878.19 9941.57,10878.19 5000,10888.19 5930,10888.19 6950.79,10888.19 7880.79,10888.19 8901.57,10888.19 9831.57,10888.19 5595,10913.19 5675,10913.19 7545.79,10913.19 7625.79,10913.19 9496.57,10913.19 9576.57,10913.19 5225,10918.19 5300,10918.19 5410,10918.19 7175.79,10918.19 7250.79,10918.19 7360.79,10918.19 9126.57,10918.19 9201.57,10918.19 9311.57,10918.19 5140,10928.19 5500,10928.19 7090.79,10928.19 7450.79,10928.19 9041.57,10928.19 9401.57,10928.19 5835,10933.19 5985,10933.19 7785.79,10933.19 7935.79,10933.19 9736.57,10933.19 9886.57,10933.19 5085,10943.19 7035.79,10943.19 8986.57,10943.19 4945,10948.19 6895.79,10948.19 8846.57,10948.19 6040,10953.19 7990.79,10953.19 9941.57,10953.19 4835,10983.19 5020,10983.19 6785.79,10983.19 6970.79,10983.19 8736.57,10983.19 8921.57,10983.19 5190,10988.19 6110,10988.19 7140.79,10988.19 8060.79,10988.19 9091.57,10988.19 10011.57,10988.19 4745,10998.19 6695.79,10998.19 8646.57,10998.19 5875,11013.19 7825.79,11013.19 9776.57,11013.19 5105,11018.19 6045,11018.19 7055.79,11018.19 7995.79,11018.19 9006.57,11018.19 9946.57,11018.19 4910,11028.19 6860.79,11028.19 8811.57,11028.19 5245,11038.19 7195.79,11038.19 9146.57,11038.19 5010,11043.19 6090,11043.19 6960.79,11043.19 8040.79,11043.19 8911.57,11043.19 9991.57,11043.19 5165,11048.19 7115.79,11048.19 9066.57,11048.19 5055,11053.19 7005.79,11053.19 8956.57,11053.19 5855,11058.19 7805.79,11058.19 9756.57,11058.19 5440,11078.19 5725,11078.19 7390.79,11078.19 7675.79,11078.19 9341.57,11078.19 9626.57,11078.19 5355,11093.19 5560,11093.19 7305.79,11093.19 7510.79,11093.19 9256.57,11093.19 9461.57,11093.19 4780,11094.45 6730.79,11094.45 8681.57,11094.45 6065,11104.45 8015.79,11104.45 9966.57,11104.45 4990,11119.45 5225,11119.45 5490,11119.45 5680,11119.45 5835,11119.45 5940,11119.45 6940.79,11119.45 7175.79,11119.45 7440.79,11119.45 7630.79,11119.45 7785.79,11119.45 7890.79,11119.45 8891.57,11119.45 9126.57,11119.45 9391.57,11119.45 9581.57,11119.45 9736.57,11119.45 9841.57,11119.45 22823.39,13593.41
  other v2: 5485,8210 5535,8210 7435.79,8210 7485.79,8210 9386.57,8210 9436.57,8210 5510,8235 7460.79,8235 9411.57,8235 5485,8260 5535,8260 7435.79,8260 7485.79,8260 9386.57,8260 9436.57,8260 5485,9454.09 5535,9454.09 7435.79,9454.09 7485.79,9454.09 9386.57,9454.09 9436.57,9454.09 5510,9479.09 7460.79,9479.09 9411.57,9479.09 5485,9504.09 5535,9504.09 7435.79,9504.09 7485.79,9504.09 9386.57,9504.09 9436.57,9504.09 5485,10698.19 5535,10698.19 7435.79,10698.19 7485.79,10698.19 9386.57,10698.19 9436.57,10698.19 5510,10723.19 7460.79,10723.19 9411.57,10723.19 5485,10748.19 5535,10748.19 7435.79,10748.19 7485.79,10748.19 9386.57,10748.19 9436.57,10748.19

## Polygon pours and split planes (outlines as drawn)
no net on Top Layer "NONET_L01_P090" (solid, remove dead copper, pour order 90): 8622.44,10019.93 ccw(c8740.55,10019.93) 8740.55,9901.82 10295.67,9901.82 10295.67,9905.75 cw(c10337.01,9905.75) 10378.35,9905.75 10378.35,9901.82 10455.12,9901.82 ccw(c10455.12,9941.19) 10494.49,9941.19 10494.49,10464.81 ccw(c10455.12,10464.81) 10455.12,10504.18 10368.5,10504.18 10368.5,10431.34 cw(c10337.01,10431.34) 10305.51,10431.34 10305.51,10504.18 10073.23,10504.18 cw(c10073.23,10543.55) 10033.86,10543.55 10033.86,11027.8 ccw(c9915.75,11027.8) 9915.75,11145.91 8740.55,11145.91 ccw(c8740.55,11027.8) 8622.44,11027.8
no net on Top Layer "NONET_L01_P082" (solid, remove dead copper, pour order 82): 8622.44,8775.83 ccw(c8740.55,8775.83) 8740.55,8657.72 10295.67,8657.72 10295.67,8661.66 cw(c10337.01,8661.66) 10378.35,8661.66 10378.35,8657.72 10455.12,8657.72 ccw(c10455.12,8697.09) 10494.49,8697.09 10494.49,9220.72 ccw(c10455.12,9220.72) 10455.12,9260.09 10368.5,9260.09 10368.5,9187.25 cw(c10337.01,9187.25) 10305.51,9187.25 10305.51,9260.09 10073.23,9260.09 cw(c10073.23,9299.46) 10033.86,9299.46 10033.86,9783.71 ccw(c9915.75,9783.71) 9915.75,9901.82 8740.55,9901.82 ccw(c8740.55,9783.71) 8622.44,9783.71
no net on Top Layer "NONET_L01_P074" (solid, remove dead copper, pour order 74): 6671.65,10019.93 ccw(c6789.77,10019.93) 6789.77,9901.82 8344.88,9901.82 8344.88,9905.75 cw(c8386.22,9905.75) 8427.56,9905.75 8427.56,9901.82 8504.33,9901.82 ccw(c8504.33,9941.19) 8543.7,9941.19 8543.7,10464.81 ccw(c8504.33,10464.81) 8504.33,10504.18 8417.72,10504.18 8417.72,10431.34 cw(c8386.22,10431.34) 8354.73,10431.34 8354.73,10504.18 8122.44,10504.18 cw(c8122.44,10543.55) 8083.07,10543.55 8083.07,11027.8 ccw(c7964.96,11027.8) 7964.96,11145.91 6789.77,11145.91 ccw(c6789.77,11027.8) 6671.65,11027.8
no net on Top Layer "NONET_L01_P066" (solid, remove dead copper, pour order 66): 6671.65,8775.83 ccw(c6789.77,8775.83) 6789.77,8657.72 8344.88,8657.72 8344.88,8661.66 cw(c8386.22,8661.66) 8427.56,8661.66 8427.56,8657.72 8504.33,8657.72 ccw(c8504.33,8697.09) 8543.7,8697.09 8543.7,9220.72 ccw(c8504.33,9220.72) 8504.33,9260.09 8417.72,9260.09 8417.72,9187.25 cw(c8386.22,9187.25) 8354.73,9187.25 8354.73,9260.09 8122.44,9260.09 cw(c8122.44,9299.46) 8083.07,9299.46 8083.07,9783.71 ccw(c7964.96,9783.71) 7964.96,9901.82 6789.77,9901.82 ccw(c6789.77,9783.71) 6671.65,9783.71
no net on Top Layer "NONET_L01_P058" (solid, remove dead copper, pour order 58): 4720.87,10019.93 ccw(c4838.98,10019.93) 4838.98,9901.82 6394.1,9901.82 6394.1,9905.75 cw(c6435.43,9905.75) 6476.77,9905.75 6476.77,9901.82 6553.54,9901.82 ccw(c6553.54,9941.19) 6592.91,9941.19 6592.91,10464.81 ccw(c6553.54,10464.81) 6553.54,10504.18 6466.93,10504.18 6466.93,10431.34 cw(c6435.43,10431.34) 6403.94,10431.34 6403.94,10504.18 6171.65,10504.18 cw(c6171.65,10543.55) 6132.28,10543.55 6132.28,11027.8 ccw(c6014.17,11027.8) 6014.17,11145.91 4838.98,11145.91 ccw(c4838.98,11027.8) 4720.87,11027.8
no net on Top Layer "NONET_L01_P050" (solid, remove dead copper, pour order 50): 4720.87,8775.83 ccw(c4838.98,8775.83) 4838.98,8657.72 6394.1,8657.72 6394.1,8661.66 cw(c6435.43,8661.66) 6476.77,8661.66 6476.77,8657.72 6553.54,8657.72 ccw(c6553.54,8697.09) 6592.91,8697.09 6592.91,9220.71 ccw(c6553.54,9220.71) 6553.54,9260.08 6466.93,9260.08 6466.93,9187.25 cw(c6435.43,9187.25) 6403.94,9187.25 6403.94,9260.08 6171.65,9260.08 cw(c6171.65,9299.45) 6132.28,9299.45 6132.28,9783.71 ccw(c6014.17,9783.71) 6014.17,9901.82 4838.98,9901.82 ccw(c4838.98,9783.71) 4720.87,9783.71
no net on Top Layer "NONET_L01_P042" (solid, remove dead copper, pour order 42): 4720.87,7531.74 ccw(c4838.98,7531.74) 4838.98,7413.63 6394.1,7413.63 6394.1,7417.57 cw(c6435.43,7417.57) 6476.77,7417.57 6476.77,7413.63 6553.54,7413.63 ccw(c6553.54,7453) 6592.91,7453 6592.91,7976.62 ccw(c6553.54,7976.62) 6553.54,8015.99 6466.93,8015.99 6466.93,7943.16 cw(c6435.43,7943.16) 6403.94,7943.16 6403.94,8015.99 6171.65,8015.99 cw(c6171.65,8055.36) 6132.28,8055.36 6132.28,8539.61 ccw(c6014.17,8539.61) 6014.17,8657.72 4838.98,8657.72 ccw(c4838.98,8539.61) 4720.87,8539.61
no net on Top Layer "NONET_L01_P034" (solid, remove dead copper, pour order 34): 6671.65,7531.74 ccw(c6789.77,7531.74) 6789.77,7413.63 8344.88,7413.63 8344.88,7417.57 cw(c8386.22,7417.57) 8427.56,7417.57 8427.56,7413.63 8504.33,7413.63 ccw(c8504.33,7453) 8543.7,7453 8543.7,7976.62 ccw(c8504.33,7976.62) 8504.33,8015.99 8417.72,8015.99 8417.72,7943.16 cw(c8386.22,7943.16) 8354.73,7943.16 8354.73,8015.99 8122.44,8015.99 cw(c8122.44,8055.36) 8083.07,8055.36 8083.07,8539.61 ccw(c7964.96,8539.61) 7964.96,8657.72 6789.77,8657.72 ccw(c6789.77,8539.61) 6671.65,8539.61
no net on Top Layer "NONET_L01_P026" (solid, remove dead copper, pour order 26): 8622.44,7531.74 ccw(c8740.55,7531.74) 8740.55,7413.63 10295.67,7413.63 10295.67,7417.57 cw(c10337.01,7417.57) 10378.35,7417.57 10378.35,7413.63 10455.12,7413.63 ccw(c10455.12,7453) 10494.49,7453 10494.49,7976.62 ccw(c10455.12,7976.62) 10455.12,8015.99 10368.5,8015.99 10368.5,7943.16 cw(c10337.01,7943.16) 10305.51,7943.16 10305.51,8015.99 10073.23,8015.99 cw(c10073.23,8055.36) 10033.86,8055.36 10033.86,8539.61 ccw(c9915.75,8539.61) 9915.75,8657.72 8740.55,8657.72 ccw(c8740.55,8539.61) 8622.44,8539.61
no net on Bottom Layer "NONET_L04_P092" (solid, remove dead copper, pour order 92): 8622.44,10019.93 ccw(c8740.55,10019.93) 8740.55,9901.82 10295.67,9901.82 10295.67,9905.75 cw(c10337.01,9905.75) 10378.35,9905.75 10378.35,9901.82 10455.12,9901.82 ccw(c10455.12,9941.19) 10494.49,9941.19 10494.49,10464.81 ccw(c10455.12,10464.81) 10455.12,10504.18 10368.5,10504.18 10368.5,10431.34 cw(c10337.01,10431.34) 10305.51,10431.34 10305.51,10504.18 10073.23,10504.18 cw(c10073.23,10543.55) 10033.86,10543.55 10033.86,11027.8 ccw(c9915.75,11027.8) 9915.75,11145.91 8740.55,11145.91 ccw(c8740.55,11027.8) 8622.44,11027.8
no net on Bottom Layer "NONET_L04_P084" (solid, remove dead copper, pour order 84): 8622.44,8775.83 ccw(c8740.55,8775.83) 8740.55,8657.72 10295.67,8657.72 10295.67,8661.66 cw(c10337.01,8661.66) 10378.35,8661.66 10378.35,8657.72 10455.12,8657.72 ccw(c10455.12,8697.09) 10494.49,8697.09 10494.49,9220.72 ccw(c10455.12,9220.72) 10455.12,9260.09 10368.5,9260.09 10368.5,9187.25 cw(c10337.01,9187.25) 10305.51,9187.25 10305.51,9260.09 10073.23,9260.09 cw(c10073.23,9299.46) 10033.86,9299.46 10033.86,9783.71 ccw(c9915.75,9783.71) 9915.75,9901.82 8740.55,9901.82 ccw(c8740.55,9783.71) 8622.44,9783.71
no net on Bottom Layer "NONET_L04_P076" (solid, remove dead copper, pour order 76): 6671.65,10019.93 ccw(c6789.77,10019.93) 6789.77,9901.82 8344.88,9901.82 8344.88,9905.75 cw(c8386.22,9905.75) 8427.56,9905.75 8427.56,9901.82 8504.33,9901.82 ccw(c8504.33,9941.19) 8543.7,9941.19 8543.7,10464.81 ccw(c8504.33,10464.81) 8504.33,10504.18 8417.72,10504.18 8417.72,10431.34 cw(c8386.22,10431.34) 8354.73,10431.34 8354.73,10504.18 8122.44,10504.18 cw(c8122.44,10543.55) 8083.07,10543.55 8083.07,11027.8 ccw(c7964.96,11027.8) 7964.96,11145.91 6789.77,11145.91 ccw(c6789.77,11027.8) 6671.65,11027.8
no net on Bottom Layer "NONET_L04_P068" (solid, remove dead copper, pour order 68): 6671.65,8775.83 ccw(c6789.77,8775.83) 6789.77,8657.72 8344.88,8657.72 8344.88,8661.66 cw(c8386.22,8661.66) 8427.56,8661.66 8427.56,8657.72 8504.33,8657.72 ccw(c8504.33,8697.09) 8543.7,8697.09 8543.7,9220.72 ccw(c8504.33,9220.72) 8504.33,9260.09 8417.72,9260.09 8417.72,9187.25 cw(c8386.22,9187.25) 8354.73,9187.25 8354.73,9260.09 8122.44,9260.09 cw(c8122.44,9299.46) 8083.07,9299.46 8083.07,9783.71 ccw(c7964.96,9783.71) 7964.96,9901.82 6789.77,9901.82 ccw(c6789.77,9783.71) 6671.65,9783.71
no net on Bottom Layer "NONET_L04_P060" (solid, remove dead copper, pour order 60): 4720.87,10019.93 ccw(c4838.98,10019.93) 4838.98,9901.82 6394.1,9901.82 6394.1,9905.75 cw(c6435.43,9905.75) 6476.77,9905.75 6476.77,9901.82 6553.54,9901.82 ccw(c6553.54,9941.19) 6592.91,9941.19 6592.91,10464.81 ccw(c6553.54,10464.81) 6553.54,10504.18 6466.93,10504.18 6466.93,10431.34 cw(c6435.43,10431.34) 6403.94,10431.34 6403.94,10504.18 6171.65,10504.18 cw(c6171.65,10543.55) 6132.28,10543.55 6132.28,11027.8 ccw(c6014.17,11027.8) 6014.17,11145.91 4838.98,11145.91 ccw(c4838.98,11027.8) 4720.87,11027.8
no net on Bottom Layer "NONET_L04_P052" (solid, remove dead copper, pour order 52): 4720.87,8775.83 ccw(c4838.98,8775.83) 4838.98,8657.72 6394.1,8657.72 6394.1,8661.66 cw(c6435.43,8661.66) 6476.77,8661.66 6476.77,8657.72 6553.54,8657.72 ccw(c6553.54,8697.09) 6592.91,8697.09 6592.91,9220.71 ccw(c6553.54,9220.71) 6553.54,9260.08 6466.93,9260.08 6466.93,9187.25 cw(c6435.43,9187.25) 6403.94,9187.25 6403.94,9260.08 6171.65,9260.08 cw(c6171.65,9299.45) 6132.28,9299.45 6132.28,9783.71 ccw(c6014.17,9783.71) 6014.17,9901.82 4838.98,9901.82 ccw(c4838.98,9783.71) 4720.87,9783.71
no net on Bottom Layer "NONET_L02_P044" (solid, remove dead copper, pour order 44): 4720.87,7531.74 ccw(c4838.98,7531.74) 4838.98,7413.63 6394.1,7413.63 6394.1,7417.57 cw(c6435.43,7417.57) 6476.77,7417.57 6476.77,7413.63 6553.54,7413.63 ccw(c6553.54,7453) 6592.91,7453 6592.91,7976.62 ccw(c6553.54,7976.62) 6553.54,8015.99 6466.93,8015.99 6466.93,7943.16 cw(c6435.43,7943.16) 6403.94,7943.16 6403.94,8015.99 6171.65,8015.99 cw(c6171.65,8055.36) 6132.28,8055.36 6132.28,8539.61 ccw(c6014.17,8539.61) 6014.17,8657.72 4838.98,8657.72 ccw(c4838.98,8539.61) 4720.87,8539.61
no net on Bottom Layer "NONET_L02_P036" (solid, remove dead copper, pour order 36): 6671.65,7531.74 ccw(c6789.77,7531.74) 6789.77,7413.63 8344.88,7413.63 8344.88,7417.57 cw(c8386.22,7417.57) 8427.56,7417.57 8427.56,7413.63 8504.33,7413.63 ccw(c8504.33,7453) 8543.7,7453 8543.7,7976.62 ccw(c8504.33,7976.62) 8504.33,8015.99 8417.72,8015.99 8417.72,7943.16 cw(c8386.22,7943.16) 8354.73,7943.16 8354.73,8015.99 8122.44,8015.99 cw(c8122.44,8055.36) 8083.07,8055.36 8083.07,8539.61 ccw(c7964.96,8539.61) 7964.96,8657.72 6789.77,8657.72 ccw(c6789.77,8539.61) 6671.65,8539.61
no net on Bottom Layer "NONET_L02_P028" (solid, remove dead copper, pour order 28): 8622.44,7531.74 ccw(c8740.55,7531.74) 8740.55,7413.63 10295.67,7413.63 10295.67,7417.57 cw(c10337.01,7417.57) 10378.35,7417.57 10378.35,7413.63 10455.12,7413.63 ccw(c10455.12,7453) 10494.49,7453 10494.49,7976.62 ccw(c10455.12,7976.62) 10455.12,8015.99 10368.5,8015.99 10368.5,7943.16 cw(c10337.01,7943.16) 10305.51,7943.16 10305.51,8015.99 10073.23,8015.99 cw(c10073.23,8055.36) 10033.86,8055.36 10033.86,8539.61 ccw(c9915.75,8539.61) 9915.75,8657.72 8740.55,8657.72 ccw(c8740.55,8539.61) 8622.44,8539.61
no net on Mid-Layer 1 "Layer1-GND" (solid, remove dead copper, pour order 94): 8622.44,10019.93 ccw(c8740.55,10019.93) 8740.55,9901.82 10295.67,9901.82 10295.67,9905.75 cw(c10337.01,9905.75) 10378.35,9905.75 10378.35,9901.82 10455.12,9901.82 ccw(c10455.12,9941.19) 10494.49,9941.19 10494.49,10464.81 ccw(c10455.12,10464.81) 10455.12,10504.18 10368.5,10504.18 10368.5,10431.34 cw(c10337.01,10431.34) 10305.51,10431.34 10305.51,10504.18 10073.23,10504.18 cw(c10073.23,10543.55) 10033.86,10543.55 10033.86,11027.8 ccw(c9915.75,11027.8) 9915.75,11145.91 8740.55,11145.91 ccw(c8740.55,11027.8) 8622.44,11027.8
no net on Mid-Layer 1 "Layer1-GND" (solid, remove dead copper, pour order 86): 8622.44,8775.83 ccw(c8740.55,8775.83) 8740.55,8657.72 10295.67,8657.72 10295.67,8661.66 cw(c10337.01,8661.66) 10378.35,8661.66 10378.35,8657.72 10455.12,8657.72 ccw(c10455.12,8697.09) 10494.49,8697.09 10494.49,9220.72 ccw(c10455.12,9220.72) 10455.12,9260.09 10368.5,9260.09 10368.5,9187.25 cw(c10337.01,9187.25) 10305.51,9187.25 10305.51,9260.09 10073.23,9260.09 cw(c10073.23,9299.46) 10033.86,9299.46 10033.86,9783.71 ccw(c9915.75,9783.71) 9915.75,9901.82 8740.55,9901.82 ccw(c8740.55,9783.71) 8622.44,9783.71
no net on Mid-Layer 1 "Layer1-GND" (solid, remove dead copper, pour order 78): 6671.65,10019.93 ccw(c6789.77,10019.93) 6789.77,9901.82 8344.88,9901.82 8344.88,9905.75 cw(c8386.22,9905.75) 8427.56,9905.75 8427.56,9901.82 8504.33,9901.82 ccw(c8504.33,9941.19) 8543.7,9941.19 8543.7,10464.81 ccw(c8504.33,10464.81) 8504.33,10504.18 8417.72,10504.18 8417.72,10431.34 cw(c8386.22,10431.34) 8354.73,10431.34 8354.73,10504.18 8122.44,10504.18 cw(c8122.44,10543.55) 8083.07,10543.55 8083.07,11027.8 ccw(c7964.96,11027.8) 7964.96,11145.91 6789.77,11145.91 ccw(c6789.77,11027.8) 6671.65,11027.8
no net on Mid-Layer 1 "Layer1-GND" (solid, remove dead copper, pour order 70): 6671.65,8775.83 ccw(c6789.77,8775.83) 6789.77,8657.72 8344.88,8657.72 8344.88,8661.66 cw(c8386.22,8661.66) 8427.56,8661.66 8427.56,8657.72 8504.33,8657.72 ccw(c8504.33,8697.09) 8543.7,8697.09 8543.7,9220.72 ccw(c8504.33,9220.72) 8504.33,9260.09 8417.72,9260.09 8417.72,9187.25 cw(c8386.22,9187.25) 8354.73,9187.25 8354.73,9260.09 8122.44,9260.09 cw(c8122.44,9299.46) 8083.07,9299.46 8083.07,9783.71 ccw(c7964.96,9783.71) 7964.96,9901.82 6789.77,9901.82 ccw(c6789.77,9783.71) 6671.65,9783.71
no net on Mid-Layer 1 "Layer1-GND" (solid, remove dead copper, pour order 62): 4720.87,10019.93 ccw(c4838.98,10019.93) 4838.98,9901.82 6394.1,9901.82 6394.1,9905.75 cw(c6435.43,9905.75) 6476.77,9905.75 6476.77,9901.82 6553.54,9901.82 ccw(c6553.54,9941.19) 6592.91,9941.19 6592.91,10464.81 ccw(c6553.54,10464.81) 6553.54,10504.18 6466.93,10504.18 6466.93,10431.34 cw(c6435.43,10431.34) 6403.94,10431.34 6403.94,10504.18 6171.65,10504.18 cw(c6171.65,10543.55) 6132.28,10543.55 6132.28,11027.8 ccw(c6014.17,11027.8) 6014.17,11145.91 4838.98,11145.91 ccw(c4838.98,11027.8) 4720.87,11027.8
no net on Mid-Layer 1 "Layer1-GND" (solid, remove dead copper, pour order 54): 4720.87,8775.83 ccw(c4838.98,8775.83) 4838.98,8657.72 6394.1,8657.72 6394.1,8661.66 cw(c6435.43,8661.66) 6476.77,8661.66 6476.77,8657.72 6553.54,8657.72 ccw(c6553.54,8697.09) 6592.91,8697.09 6592.91,9220.71 ccw(c6553.54,9220.71) 6553.54,9260.08 6466.93,9260.08 6466.93,9187.25 cw(c6435.43,9187.25) 6403.94,9187.25 6403.94,9260.08 6171.65,9260.08 cw(c6171.65,9299.45) 6132.28,9299.45 6132.28,9783.71 ccw(c6014.17,9783.71) 6014.17,9901.82 4838.98,9901.82 ccw(c4838.98,9783.71) 4720.87,9783.71
no net on Mid-Layer 1 "Layer1-GND" (solid, remove dead copper, pour order 46): 4720.87,7531.74 ccw(c4838.98,7531.74) 4838.98,7413.63 6394.1,7413.63 6394.1,7417.57 cw(c6435.43,7417.57) 6476.77,7417.57 6476.77,7413.63 6553.54,7413.63 ccw(c6553.54,7453) 6592.91,7453 6592.91,7976.62 ccw(c6553.54,7976.62) 6553.54,8015.99 6466.93,8015.99 6466.93,7943.16 cw(c6435.43,7943.16) 6403.94,7943.16 6403.94,8015.99 6171.65,8015.99 cw(c6171.65,8055.36) 6132.28,8055.36 6132.28,8539.61 ccw(c6014.17,8539.61) 6014.17,8657.72 4838.98,8657.72 ccw(c4838.98,8539.61) 4720.87,8539.61
no net on Mid-Layer 1 "Layer1-GND" (solid, remove dead copper, pour order 38): 6671.65,7531.74 ccw(c6789.77,7531.74) 6789.77,7413.63 8344.88,7413.63 8344.88,7417.57 cw(c8386.22,7417.57) 8427.56,7417.57 8427.56,7413.63 8504.33,7413.63 ccw(c8504.33,7453) 8543.7,7453 8543.7,7976.62 ccw(c8504.33,7976.62) 8504.33,8015.99 8417.72,8015.99 8417.72,7943.16 cw(c8386.22,7943.16) 8354.73,7943.16 8354.73,8015.99 8122.44,8015.99 cw(c8122.44,8055.36) 8083.07,8055.36 8083.07,8539.61 ccw(c7964.96,8539.61) 7964.96,8657.72 6789.77,8657.72 ccw(c6789.77,8539.61) 6671.65,8539.61
no net on Mid-Layer 1 "Layer1-GND" (solid, remove dead copper, pour order 30): 8622.44,7531.74 ccw(c8740.55,7531.74) 8740.55,7413.63 10295.67,7413.63 10295.67,7417.57 cw(c10337.01,7417.57) 10378.35,7417.57 10378.35,7413.63 10455.12,7413.63 ccw(c10455.12,7453) 10494.49,7453 10494.49,7976.62 ccw(c10455.12,7976.62) 10455.12,8015.99 10368.5,8015.99 10368.5,7943.16 cw(c10337.01,7943.16) 10305.51,7943.16 10305.51,8015.99 10073.23,8015.99 cw(c10073.23,8055.36) 10033.86,8055.36 10033.86,8539.61 ccw(c9915.75,8539.61) 9915.75,8657.72 8740.55,8657.72 ccw(c8740.55,8539.61) 8622.44,8539.61
no net on Mid-Layer 2 "Layer2-GND" (solid, remove dead copper, pour order 96): 8622.44,10019.93 ccw(c8740.55,10019.93) 8740.55,9901.82 10295.67,9901.82 10295.67,9905.75 cw(c10337.01,9905.75) 10378.35,9905.75 10378.35,9901.82 10455.12,9901.82 ccw(c10455.12,9941.19) 10494.49,9941.19 10494.49,10464.81 ccw(c10455.12,10464.81) 10455.12,10504.18 10368.5,10504.18 10368.5,10431.34 cw(c10337.01,10431.34) 10305.51,10431.34 10305.51,10504.18 10073.23,10504.18 cw(c10073.23,10543.55) 10033.86,10543.55 10033.86,11027.8 ccw(c9915.75,11027.8) 9915.75,11145.91 8740.55,11145.91 ccw(c8740.55,11027.8) 8622.44,11027.8
no net on Mid-Layer 2 "Layer2-GND" (solid, remove dead copper, pour order 88): 8622.44,8775.83 ccw(c8740.55,8775.83) 8740.55,8657.72 10295.67,8657.72 10295.67,8661.66 cw(c10337.01,8661.66) 10378.35,8661.66 10378.35,8657.72 10455.12,8657.72 ccw(c10455.12,8697.09) 10494.49,8697.09 10494.49,9220.72 ccw(c10455.12,9220.72) 10455.12,9260.09 10368.5,9260.09 10368.5,9187.25 cw(c10337.01,9187.25) 10305.51,9187.25 10305.51,9260.09 10073.23,9260.09 cw(c10073.23,9299.46) 10033.86,9299.46 10033.86,9783.71 ccw(c9915.75,9783.71) 9915.75,9901.82 8740.55,9901.82 ccw(c8740.55,9783.71) 8622.44,9783.71
no net on Mid-Layer 2 "Layer2-GND" (solid, remove dead copper, pour order 80): 6671.65,10019.93 ccw(c6789.77,10019.93) 6789.77,9901.82 8344.88,9901.82 8344.88,9905.75 cw(c8386.22,9905.75) 8427.56,9905.75 8427.56,9901.82 8504.33,9901.82 ccw(c8504.33,9941.19) 8543.7,9941.19 8543.7,10464.81 ccw(c8504.33,10464.81) 8504.33,10504.18 8417.72,10504.18 8417.72,10431.34 cw(c8386.22,10431.34) 8354.73,10431.34 8354.73,10504.18 8122.44,10504.18 cw(c8122.44,10543.55) 8083.07,10543.55 8083.07,11027.8 ccw(c7964.96,11027.8) 7964.96,11145.91 6789.77,11145.91 ccw(c6789.77,11027.8) 6671.65,11027.8
no net on Mid-Layer 2 "Layer2-GND" (solid, remove dead copper, pour order 72): 6671.65,8775.83 ccw(c6789.77,8775.83) 6789.77,8657.72 8344.88,8657.72 8344.88,8661.66 cw(c8386.22,8661.66) 8427.56,8661.66 8427.56,8657.72 8504.33,8657.72 ccw(c8504.33,8697.09) 8543.7,8697.09 8543.7,9220.72 ccw(c8504.33,9220.72) 8504.33,9260.09 8417.72,9260.09 8417.72,9187.25 cw(c8386.22,9187.25) 8354.73,9187.25 8354.73,9260.09 8122.44,9260.09 cw(c8122.44,9299.46) 8083.07,9299.46 8083.07,9783.71 ccw(c7964.96,9783.71) 7964.96,9901.82 6789.77,9901.82 ccw(c6789.77,9783.71) 6671.65,9783.71
no net on Mid-Layer 2 "Layer2-GND" (solid, remove dead copper, pour order 64): 4720.87,10019.93 ccw(c4838.98,10019.93) 4838.98,9901.82 6394.1,9901.82 6394.1,9905.75 cw(c6435.43,9905.75) 6476.77,9905.75 6476.77,9901.82 6553.54,9901.82 ccw(c6553.54,9941.19) 6592.91,9941.19 6592.91,10464.81 ccw(c6553.54,10464.81) 6553.54,10504.18 6466.93,10504.18 6466.93,10431.34 cw(c6435.43,10431.34) 6403.94,10431.34 6403.94,10504.18 6171.65,10504.18 cw(c6171.65,10543.55) 6132.28,10543.55 6132.28,11027.8 ccw(c6014.17,11027.8) 6014.17,11145.91 4838.98,11145.91 ccw(c4838.98,11027.8) 4720.87,11027.8
no net on Mid-Layer 2 "Layer2-GND" (solid, remove dead copper, pour order 56): 4720.87,8775.83 ccw(c4838.98,8775.83) 4838.98,8657.72 6394.1,8657.72 6394.1,8661.66 cw(c6435.43,8661.66) 6476.77,8661.66 6476.77,8657.72 6553.54,8657.72 ccw(c6553.54,8697.09) 6592.91,8697.09 6592.91,9220.71 ccw(c6553.54,9220.71) 6553.54,9260.08 6466.93,9260.08 6466.93,9187.25 cw(c6435.43,9187.25) 6403.94,9187.25 6403.94,9260.08 6171.65,9260.08 cw(c6171.65,9299.45) 6132.28,9299.45 6132.28,9783.71 ccw(c6014.17,9783.71) 6014.17,9901.82 4838.98,9901.82 ccw(c4838.98,9783.71) 4720.87,9783.71
no net on Mid-Layer 2 "Layer2-GND" (solid, remove dead copper, pour order 48): 4720.87,7531.74 ccw(c4838.98,7531.74) 4838.98,7413.63 6394.1,7413.63 6394.1,7417.57 cw(c6435.43,7417.57) 6476.77,7417.57 6476.77,7413.63 6553.54,7413.63 ccw(c6553.54,7453) 6592.91,7453 6592.91,7976.62 ccw(c6553.54,7976.62) 6553.54,8015.99 6466.93,8015.99 6466.93,7943.16 cw(c6435.43,7943.16) 6403.94,7943.16 6403.94,8015.99 6171.65,8015.99 cw(c6171.65,8055.36) 6132.28,8055.36 6132.28,8539.61 ccw(c6014.17,8539.61) 6014.17,8657.72 4838.98,8657.72 ccw(c4838.98,8539.61) 4720.87,8539.61